# Altium PCB REV_03_Simple_PCB.PcbDoc
Units mm, origin at the board's own origin, x right, y up, seen from the top; angles counter-clockwise.
Board outline 82.44 x 101.76 mm, 2 copper layers (Top Layer, Bottom Layer); 74 components, 66 nets, 302 pads, 56 vias.
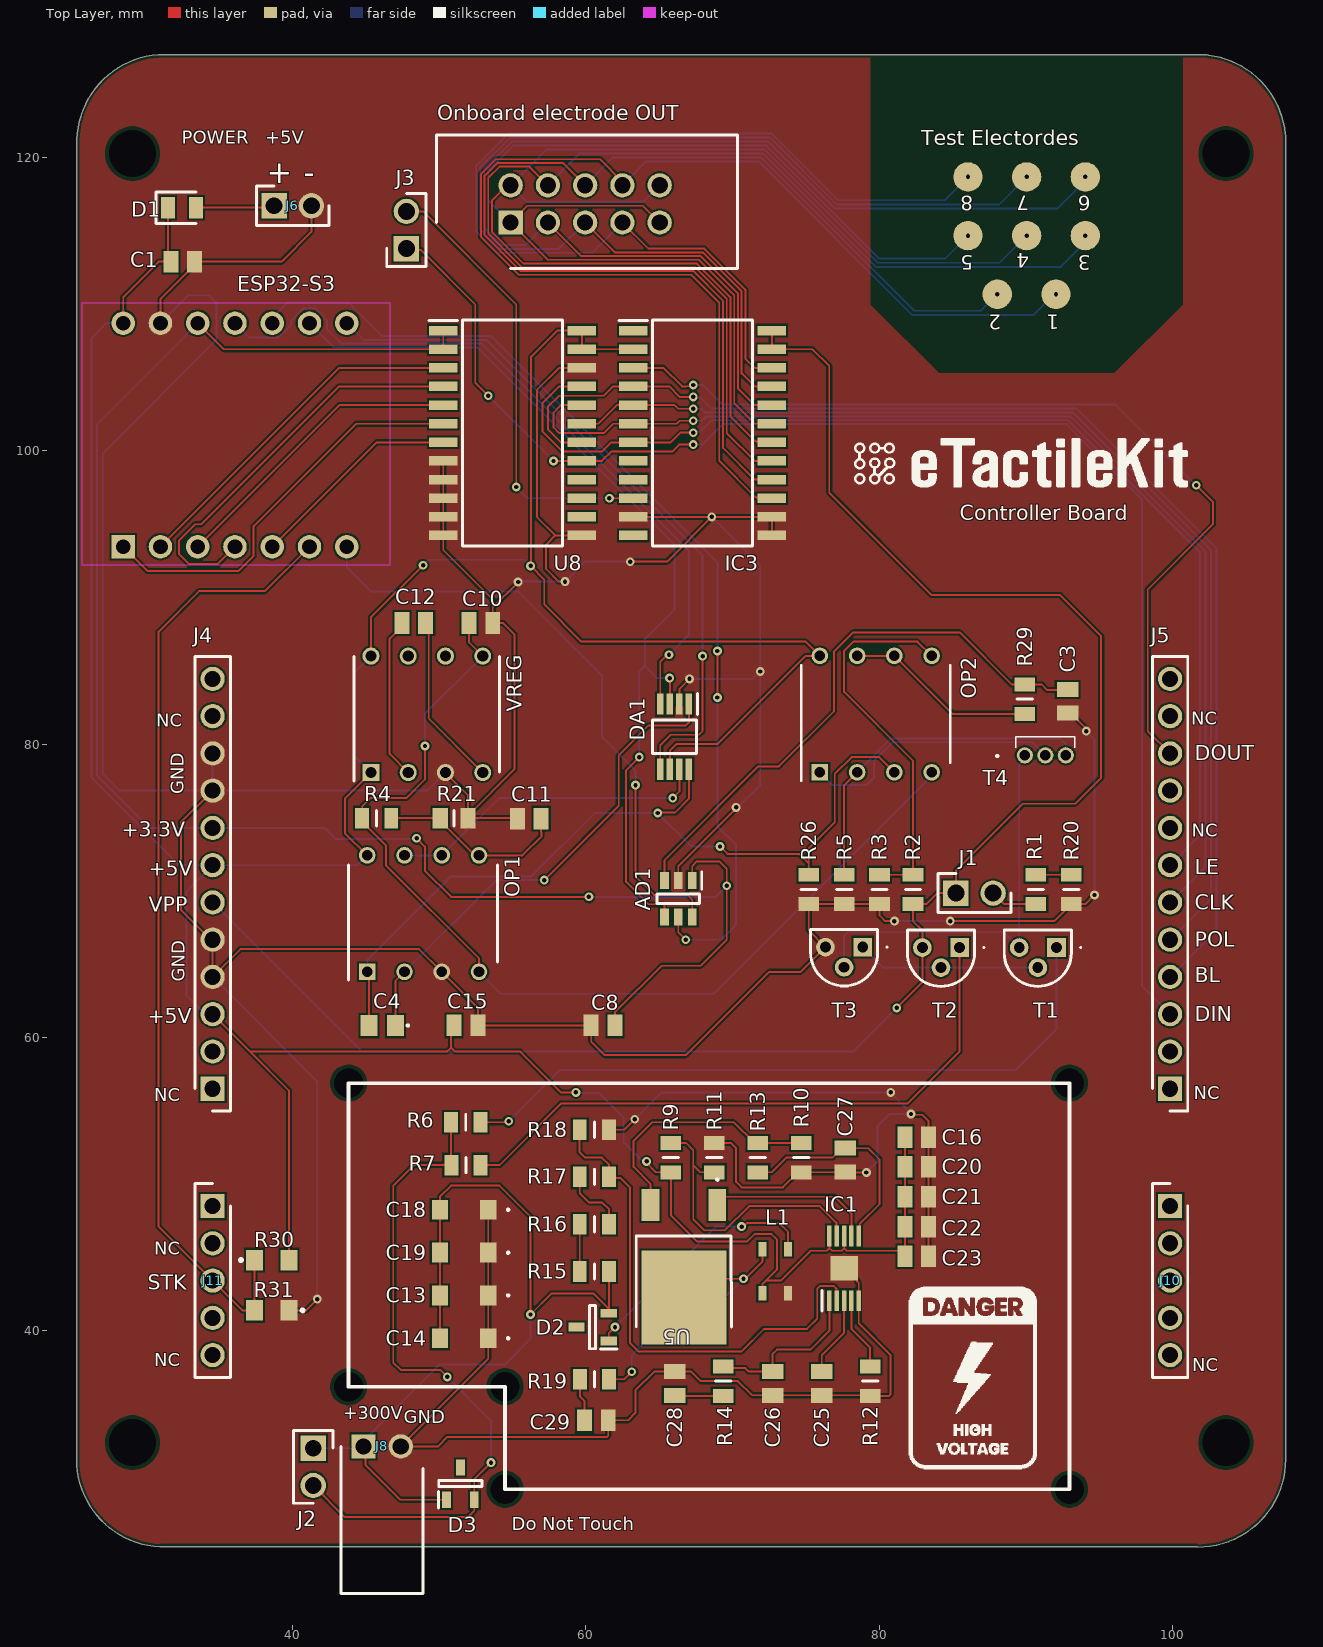
[diagram p0: Top Layer view]
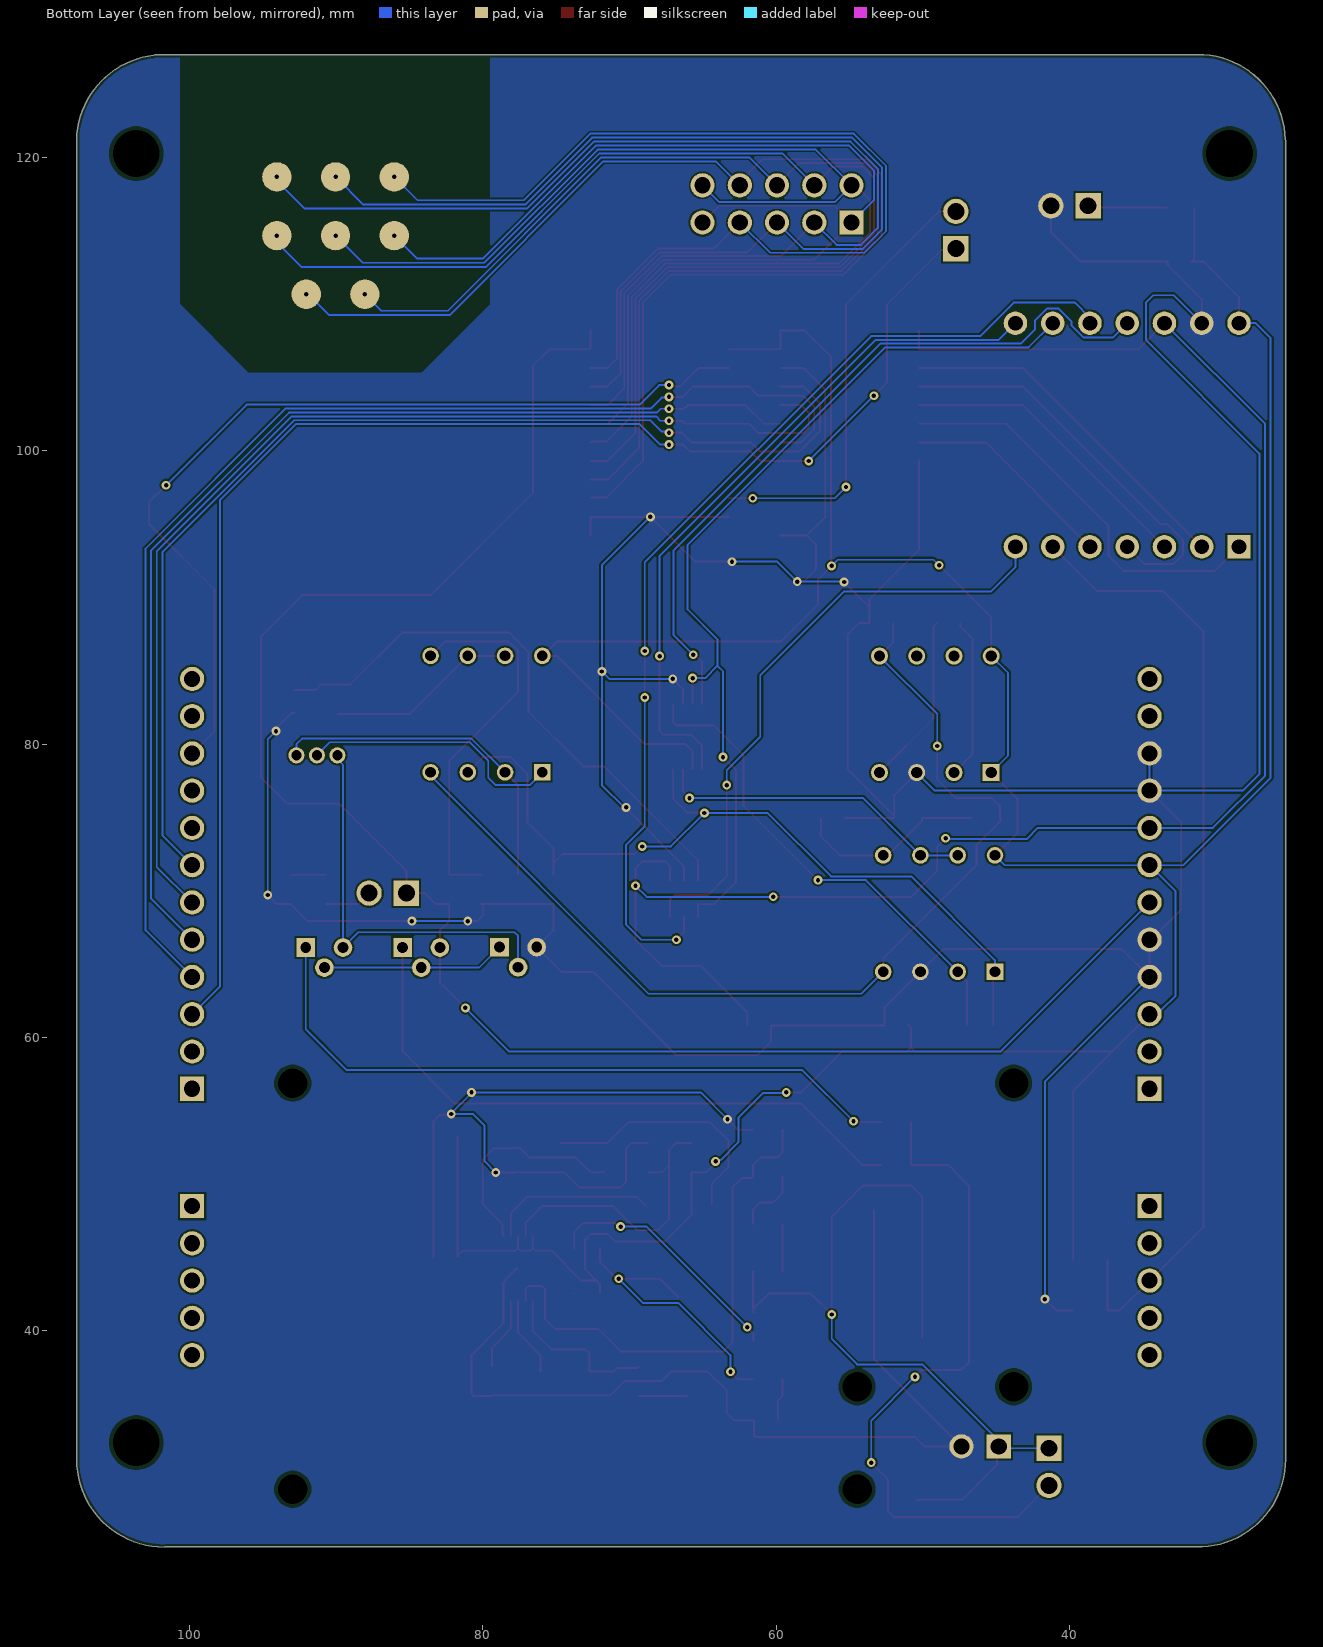
[diagram p1: Bottom Layer view, seen from below]
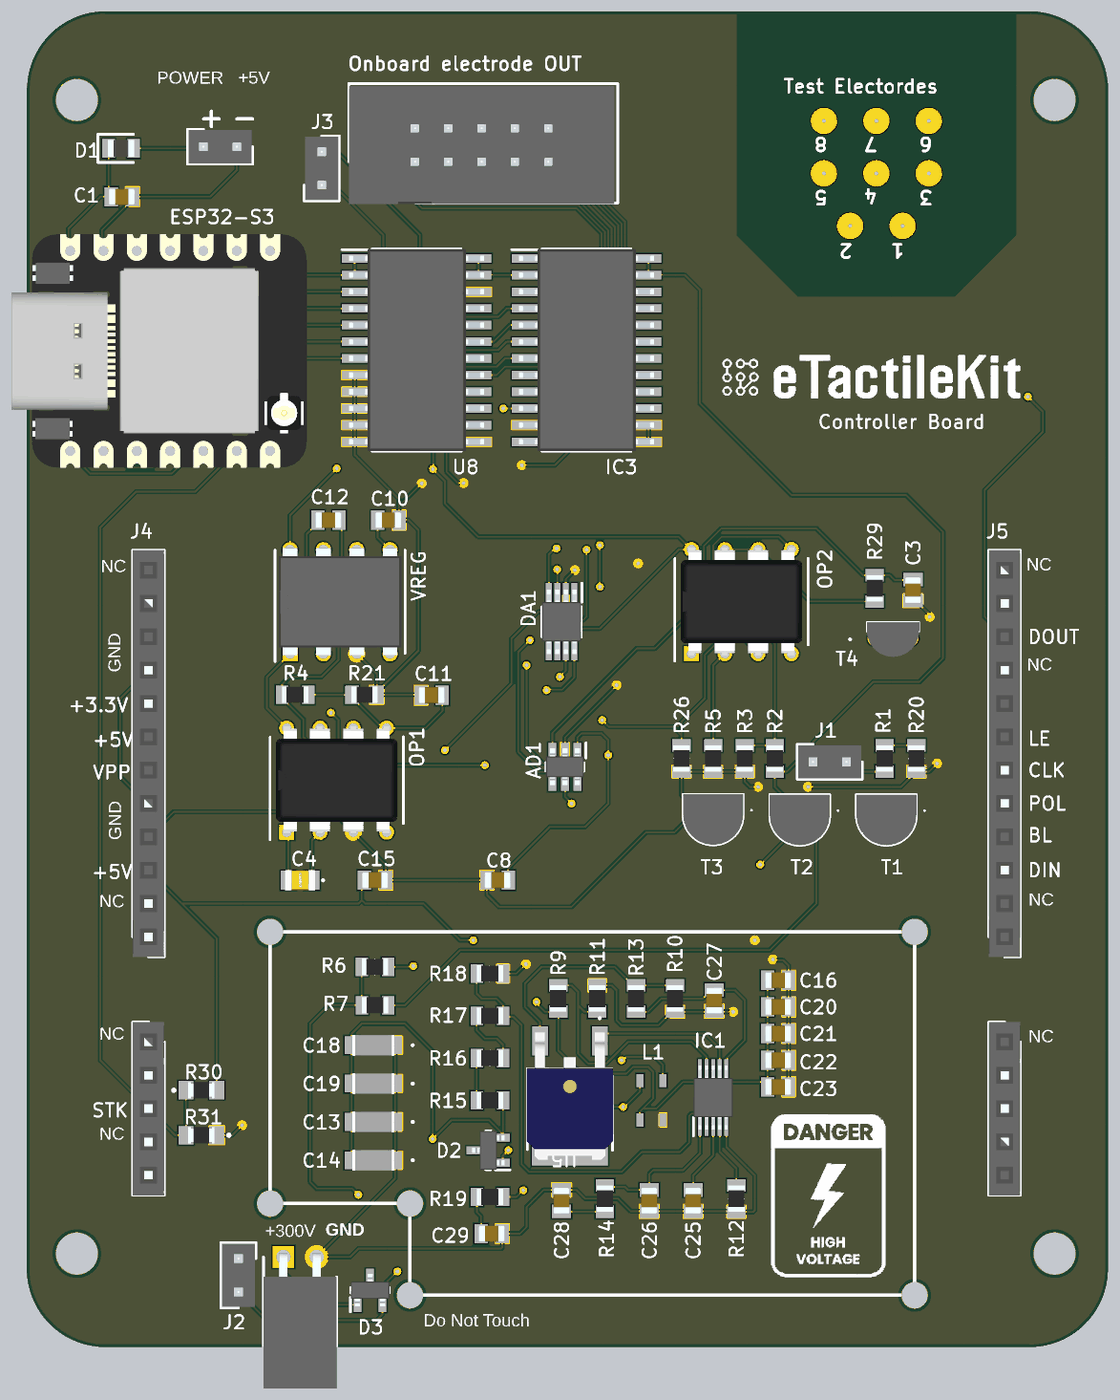
[diagram p2: 3D render of the assembled board from above, using the file's embedded part models]

## Layer stack, top to bottom
Top Solder: solder mask 0.0102, Solder Resist, Dk 3.5
Top Layer: signal copper 0.0356
Dielectric 1: dielectric 0.32, FR-4, Dk 4.8
Bottom Layer: signal copper 0.0356
Bottom Solder: solder mask 0.0102, Solder Resist, Dk 3.5

## Board outline
25.273,31.293 25.273,121.158 25.29,121.222 cw(c31.264,121.048) 31.264,127.025 31.339,127 91.821,127 101.657,127 101.726,127.021 cw(c101.726,121.044) 102.22,127 102.362,127 102.433,126.979 cw(c101.726,121.044) 107.677,121.607 107.696,121.539 107.696,121.333 cw(c101.726,121.044) 107.703,121.044 107.696,121.002 107.696,31.242 107.696,31.241 cw(c101.719,31.242) 101.719,25.265 101.676,25.273 30.988,25.273 30.945,25.28 cw(c31.242,31.25)

## Design rules (kind name [scope] priority, off if disabled: settings)
BoardOutlineClearance [All] p1: gap=0.2 ignorepadtopadclearanceinfootprint=FALSE
Clearance [All] p1: gap=0.127 ignorepadtopadclearanceinfootprint=FALSE except(0.25: Arc-Hole Track-Hole SMDPad-Hole THPad-Hole Via-Hole Fill-Hole Poly-Hole Region-Hole Text-Hole)
ComponentClearance [All] p1: gap=0.127 collisioncheckmode=3 verticalgap=0.127 showdistances=TRUE
DiffPairsRouting [All] p1: maxlimit=0.254 minlimit=0.127 mostfreqgap=0.127 toplayer_minwidth=0.127 toplayer_maxwidth=25.4 toplayer_prefwidth=0.127 bottomlayer_minwidth=0.127 bottomlayer_maxwidth=25.4 bottomlayer_prefwidth=0.127 maxuncoupledlength=12.7
Height [All] p1: minheight=0 maxheight=1816.048 prefheight=12.7
HoleSize [All] p1: absolutevalues=TRUE maxlimit=6.3 minlimit=0.3 maxpercent=80.000 minpercent=20.000
HoleToHoleClearance [All] p1: gap=0.25 allowstackedmicrovias=FALSE
MinimumAnnularRing [All] p1: minimumring=0.076
MinimumSolderMaskSliver [All] p1: minsoldermaskwidth=0
PlaneClearance [All] p1: clearance=0.127
PlaneConnect PlaneConnectPowerPads [InPadClass('PowerPads')] p1: planeconnectstyle=Direct reliefexpansion=0.508 reliefentries=4 reliefconductorwidth=0.254 reliefairgap=0.254
PlaneConnect [All] p2: planeconnectstyle=Direct reliefexpansion=0.3 reliefentries=4 reliefconductorwidth=0.127 reliefairgap=0.127
PolygonConnect PolygonConnectPowerPads [All vs (InPadClass('PowerPads'))] p1: connectstyle=Direct reliefconductorwidth=0.254 reliefentries=4 polygonreliefangle="90 Angle" airgapwidth=0.254
PolygonConnect [All] p2: connectstyle=Direct reliefconductorwidth=0.127 reliefentries=4 polygonreliefangle="90 Angle" airgapwidth=0.127
RoutingVias [All] p1: holewidth=0.3 width=0.6 viastyle="Through Hole" minholewidth=0.3 minwidth=0.6 maxholewidth=0.3 maxwidth=0.6
SilkToSilkClearance [All] p1: silktosilkclearance=0
SilkToSolderMaskClearance [IsPad] p1: minsilkscreentomaskgap=0.127 clearancetoexposedcopper=TRUE
SolderMaskExpansion [All] p1: expansion=0.075 istentingtop=FALSE
Width [All] p1: maxlimit=25.4 minlimit=0.127 preferedwidth=0.127 minimp=50.000000 maximp=50.000000 favimp=50.000000
20 further rules are at their usual default settings.

## Classes and differential pairs
net class OUT[8..1]: OUT1 OUT2 OUT3 OUT4 OUT5 OUT6 OUT7 OUT8
component class Sheet5: IC3 J3 J9 J10 J11 "Onboard electrode OUT" R30 R31
component class Sheet4: C1 C10 C12 D1 ESP32-S3 J4 J5 J6 U1 U8 VREG
component class Sheet3: C13 C14 C16 C18 C19 C20 C21 C22 C23 C25 C26 C27 C28 C29 D2 D3 IC1 J J2 J8 L1 R9 R10 R11 R12 R13 R14 R15 R16 R17 R18 R19 U5
component class Sheet2: C3 J1 OP2 R1 R2 R3 R5 R6 R7 R20 R26 R29 T1 T2 T3 T4
component class Sheet1: AD1 C4 C8 C11 C15 DA1 OP1 R4 R21

## Components (designator, comment, footprint, x,y, rotation, side; value= is the part's Value field where it differs from the comment)
AD1 "AD7276BUJZ-REEL7" SOT95P280X100-6N 66.294,69.469 r270 top
C1 "KGM21NR71E104KT" CAPC2012X100N 32.512,112.903 r180 top
C3 "08053A102FAT2A" CAPC2012X100N 92.837,82.931 r90 top
C4 "C0805C209D3HACTU" C0805 46.101,60.823 r180 top
C8 "KGM21NR71E104KT" CAPC2012X100N 61.166,60.833 r0 top
C10 "GRM21BR61A476ME15K" CAPC2012X100N 52.832,88.265 r180 top
C11 "KGM21NR71E104KT" CAPC2012X100N 56.134,74.93 r0 top
C12 "GRM21BR61A476ME15K" CAPC2012X100N 48.26,88.265 r180 top
C13 "GR331CD7LP683KW01K" C3216_Commercial 51.689,42.418 r180 top
C14 "GR331CD7LP683KW01K" C3216_Commercial 51.689,39.497 r180 top
C15 "KGM21NR71E104KT" CAPC2012X100N 51.816,60.833 r180 top
C16 "GRM21BR61A476ME15K" CAPC2012X100N 82.55,53.213 r180 top
C18 "GR331CD7LP683KW01K" C3216_Commercial 51.689,48.26 r180 top
C19 "GR331CD7LP683KW01K" C3216_Commercial 51.689,45.339 r180 top
C20 "GRM21BR61A476ME15K" CAPC2012X100N 82.55,51.181 r180 top
C21 "GRM21BR61A476ME15K" CAPC2012X100N 82.55,49.149 r180 top
C22 "GRM21BR61A476ME15K" CAPC2012X100N 82.55,47.117 r180 top
C23 "GRM21BR61A476ME15K" CAPC2012X100N 82.55,45.085 r180 top
C25 "KGM21NR71E104KT" CAPC2012X100N 76.068,36.421 r90 top
C26 "08053C101JAT2A" CAPC2012X100N 72.725,36.421 r90 top
C27 "C0805C103J3GACAUTO" CAPC2012X100N 77.687,51.661 r90 top
C28 "VJ0805Y223KXXAC" CAPC2012X100N 66.04,36.421 r270 top
C29 "08053A221KAT2A" CAPC2012X100N 60.706,33.909 r180 top
D1 "SD0805S020S0R5" DIOC2013X100N 32.451,116.586 r0 top
D2 "GSD2004S-HE3-08" SOT95P248X115-3N 60.452,40.259 r180 top
D3 "GSD2004S-HE3-08" SOT95P248X115-3N 51.435,29.591 r90 top
DA1 "AD5452YRMZ-REEL7" SOP65P490X110-8N 66.04,80.518 r270 top
ESP32-S3 "MOUDLE-SEEEDUINO-XIAO-ESP32S3-SMD" MOUDLE14P-2-54-21X17-8MM 36.068,101.092 r180 top
IC1 "LT3757IMSE#PBF" SOP50P490X110-11N 77.597,44.27 r90 top
IC3 "HV513WG-G" SOIC127P1030X265-24N 67.945,101.219 r0 top
J1 "67996-100HLF" HDRV2W67P254_2X1_254X483X858P 85.217,69.85 r270 top
J2 "67996-100HLF" HDRV2W67P254_2X1_254X483X858P 41.402,32.004 r180 top
J3 "67996-100HLF" HDRV2W67P254_2X1_254X483X858P 47.752,113.792 r0 top
J4 "SSQ-112-01-S-S" RHDR12W64P254_1X12_3099X241X851P 34.544,56.515 r270 top
J5 "SSQ-112-01-S-S" RHDR12W64P254_1X12_3099X241X851P 99.822,56.515 r270 top
J6 "67996-100HLF" HDRV2W67P254_2X1_254X483X858P 38.735,116.713 r270 top
J8 "SSQ-102-02-S-S-RA" RHDRRA2W64P254_1X2_559X851X241P 44.831,32.131 r180 top
J10 "SSQ-105-01-S-S" RHDR5W64P254_1X5_1321X241X851P 99.822,48.514 r90 top
J11 "SSQ-105-01-S-S" RHDR5W64P254_1X5_1321X241X851P 34.544,48.514 r90 top
L1 "ATB322515" ATB322515 72.898,44.069 r270 top
"Onboard electrode OUT" "PRT-08506" SHDR10W64P254_2X5_2025X900X935P 54.864,115.57 r0 top
OP1 "TL072ACP" DIP794W53P254L959H508Q8N 48.895,68.453 r90 top
OP2 "TL072ACP" DIP794W53P254L959H508Q8N 79.756,82.057 r90 top
R1 "ERJ-P06F3302V" RESC2012X60N 90.678,70.104 r270 top
R2 "HV732ARTTD105J" RESC2012X60N 82.296,70.104 r270 top
R3 "RK73H2ATTD9101F" RESC2012X60N 80.01,70.104 r90 top
R4 "RK73B2ATTD123J" RESC2012X60N 45.72,74.965 r180 top
R5 "ERJ-P06F2201V" RESC2012X60N 77.597,70.104 r90 top
R6 "ERJ-P06F2702V" RESC2012X60N 51.8,54.229 r180 top
R7 "ERJ-P06J102V" RESC2012X60N 51.816,51.308 r180 top
R9 "RCC0805100KFKEA" RESC2012X60N 65.786,51.816 r270 top
R10 "WSL0805R0200FEA18" RESC2012X60N 74.685,51.816 r270 top
R11 "RCC080547K0FKEA" RESC2012X60N 68.752,51.816 r270 top
R12 "RK73B2ATTD134J" RESC2012X60N 79.375,36.576 r90 top
R13 "ERJ-T06J220V" RESC2012X60N 71.719,51.816 r270 top
R14 "RK73B2ATTDD682J" RESC2012X60N 69.347,36.576 r90 top
R15 "ERJ-P06F1004V" RESC2012X60N 60.574,44.051 r180 top
R16 "ERJ-P06F1004V" RESC2012X60N 60.574,47.275 r0 top
R17 "ERJ-P06F1004V" RESC2012X60N 60.574,50.498 r0 top
R18 "RK73H2ATTD1782F" RESC2012X60N 60.574,53.721 r0 top
R19 "ERJ-T06J220V" RESC2012X60N 60.579,36.703 r180 top
R20 "ERJ-P06F3302V" RESC2012X60N 93.091,70.104 r90 top
R21 "ERJ-PB6B2402V" RESC2012X70N 51.005,74.965 r0 top
R26 "RK73H2ATTD1002F" RESC2012X60N 75.184,70.104 r90 top
R29 "CRS0805-FX-1000ELF" RESC2012X60N 89.916,83.074 r270 top
R30 "CRCW080540K0FKEA" ERJP06D1000V 38.576,44.831 r0 top
R31 "RCA080560K4FKEA" ERJP06D1000V 38.576,41.402 r180 top
T1 "ZTX958" KSP92BU 92.075,66.14 r0 top
T2 "ZTX958" KSP92BU 85.471,66.14 r0 top
T3 "ZTX958" KSP92BU 78.867,66.167 r0 top
T4 "ZVN0545A" BS107P 90.043,79.248 r0 top
U5 "IPD25N06S4L30ATMA2" IPD25N06S4L30ATMA2 66.675,43.371 r180 top
U8 "SN74LVC8T245DWRG4" SOIC127P1030X265-24N 54.991,101.219 r0 top
VREG "MAX1044CPA+" DIP794W56P254L938H457Q8N 49.149,82.042 r90 top

## Footprints (in the part's own frame and the unit in brackets; to place one, negate y for a bottom-side part, rotate by r counter-clockwise, add the part's x,y. Pads: shape width x height; smd on the part's side, far side on the other; paste and mask are expansions set on the pad)
ATB322515 [mm]
  rect 1x0.55 smd: P$1(-1.5,-0.875) P$2(-1.5,0.875) P$3(1.5,0.875) P$4(1.5,-0.875)
BS107P [mm]
  round 1.1 hole 0.695: 1(-0.127,0) 2(1.27,0) 3(2.667,0)
  silkscreen extent -2.05,-0.1 3.27,1.27, body extent -0.73,-1.4 3.27,1.24, height 4.11
C0805 [mm]
  rect 1.15x1.45 smd: 1(-0.9,0) 2(0.9,0)
  silkscreen extent -1.8,-0.05 -1.7,0.05, body extent -1.15,-0.78 1.15,0.77, height 0.98
C3216_Commercial [mm]
  rect 1.1x1.35 smd: 1(-1.65,0) 2(1.65,0)
  silkscreen extent -3.05,-0.05 -2.95,0.05, body extent -1.6,-0.8 1.6,0.8, height 1.6
CAPC2012X100N [mm]
  rect 1.02x1.47 smd: 1(-0.81,0) 2(0.81,0)
  body extent -1,-0.63 1,0.63, height 1
DIOC2013X100N [mm]
  rect 0.95x1.45 smd: 1(-0.95,0) 2(0.95,0)
  silkscreen extent -1.78,-1.07 0.95,1.07, body extent -1,-0.65 1,0.65, height 1
DIP794W53P254L959H508Q8N [mm]
  rect 1.13x1.13 hole 0.73: 1(-3.97,3.81)
  round 1.13 hole 0.73: 2(-3.97,1.27) 3(-3.97,-1.27) 4(-3.97,-3.81) 5(3.97,-3.81) 6(3.97,-1.27) 7(3.97,1.27) 8(3.97,3.81)
  silkscreen extent -4.53,-5.08 3.3,5.08, body extent -4.1,-4.64 4.1,4.64, height 4.21
DIP794W56P254L938H457Q8N [mm]
  rect 1.16x1.16 hole 0.76: 1(-3.97,3.81)
  round 1.16 hole 0.76: 2(-3.97,1.27) 3(-3.97,-1.27) 4(-3.97,-3.81) 5(3.97,-3.81) 6(3.97,-1.27) 7(3.97,1.27) 8(3.97,3.81)
  silkscreen extent -4.55,-4.95 3.94,4.95, body extent -4.11,-4.69 4.11,4.69, height 4.57
ERJP06D1000V [mm]
  rect 1.15x1.4 smd: 1(-1.175,0) 2(1.175,0)
  silkscreen extent -2.2,-0.1 -2,0.1, body extent -1,-0.63 1,0.63, height 0.6
HDRV2W67P254_2X1_254X483X858P [mm]
  rect 1.725x1.725 / inner round 1.725 / far side rect 1.725x1.725 hole 1.15: 1(0,0)
  round 1.725 hole 1.15: 2(0,2.54)
  silkscreen extent -1.34,-1.21 1.34,3.75, body extent -1.27,-1.14 1.27,3.68, height 8.58
IPD25N06S4L30ATMA2 [mm]
  rect 1.2x2.2 smd: 1(-2.28,-5.22) 3(2.28,-5.22)
  rect 5.8x6.4 smd: 2(0,1.08)
  silkscreen extent -3.25,-7 3.25,3.11, body extent -3.3,-5.87 3.3,3.83, height 2.4
KSP92BU [mm]
  rect 1.269x1.269 hole 0.74: 1(0,0)
  round 1.269 hole 0.74: 2(-1.27,-1.37) 3(-2.54,0)
  silkscreen extent -3.56,-2.65 1.7,1.21, body extent -3.56,-2.65 1.02,1.21, height 4.88
MOUDLE14P-2-54-21X17-8MM [mm]
  rect 1.6x1.6 / inner round 1.478 / far side rect 1.6x1.6 hole 1: 1(7.62,7.62)
  round 1.6 hole 1: 2(5.08,7.62) 3(2.54,7.62) 4(0,7.62) 5(-2.54,7.62) 6(-5.08,7.62) 7(-7.62,7.62) 8(-7.62,-7.62) 9(-5.08,-7.62) 10(-2.54,-7.62) 11(0,-7.62) 12(2.54,-7.62) 13(5.08,-7.62) 14(7.62,-7.62)
  Top Layer keep-out region: -10.541,-9.017 -10.541,8.89 10.414,8.89 10.414,-9.017
  body extent -10.54,-8.95 11.94,8.83, height 4.21
RESC2012X60N [mm]
  rect 0.95x1.4 smd: 1(-1,0) 2(1,0)
  silkscreen extent 0,-0.53 0,0.53, body extent -1,-0.63 1,0.63, height 0.6
RESC2012X70N [mm]
  rect 1.05x1.4 smd: 1(-0.95,0) 2(0.95,0)
  silkscreen extent 0,-0.53 0,0.53, body extent -1,-0.63 1,0.63, height 0.7
RHDR5W64P254_1X5_1321X241X851P [mm]
  rect 1.65x1.65 / inner round 1.65 / far side rect 1.65x1.65 hole 1.1: 1(0,0)
  round 1.65 hole 1.1: 2(-2.54,0) 3(-5.08,0) 4(-7.62,0) 5(-10.16,0)
  silkscreen extent -11.69,-1.2 1.53,1.2, body extent -11.69,-1.2 1.53,1.2, height 8.51
RHDR12W64P254_1X12_3099X241X851P [mm]
  rect 1.65x1.65 / inner round 1.65 / far side rect 1.65x1.65 hole 1.1: 1(0,0)
  round 1.65 hole 1.1: 2(-2.54,0) 3(-5.08,0) 4(-7.62,0) 5(-10.16,0) 6(-12.7,0) 7(-15.24,0) 8(-17.78,0) 9(-20.32,0) 10(-22.86,0) 11(-25.4,0) 12(-27.94,0)
  silkscreen extent -29.47,-1.2 1.53,1.2, body extent -29.47,-1.2 1.53,1.2, height 8.51
RHDRRA2W64P254_1X2_559X851X241P [mm]
  rect 1.65x1.65 hole 1.1: 1(0,0)
  round 1.65 hole 1.1: 2(-2.54,0)
  silkscreen extent -4.07,0 1.53,10.03, body extent -4.07,-0.32 1.53,10.03, height 2.41
SHDR10W64P254_2X5_2025X900X935P [mm]
  rect 1.65x1.65 hole 1.1: 1(0,0)
  round 1.65 hole 1.1: 2(0,2.54) 3(2.54,0) 4(2.54,2.54) 5(5.08,0) 6(5.08,2.54) 7(7.62,0) 8(7.62,2.54) 9(10.16,0) 10(10.16,2.54)
  silkscreen extent -5.04,-3.15 15.46,5.95, body extent -5.04,-3.23 15.2,5.77, height 9.35
SOIC127P1030X265-24N [mm]
  rect 1.95x0.65 smd: 1(-4.725,6.985) 2(-4.725,5.715) 3(-4.725,4.445) 4(-4.725,3.175) 5(-4.725,1.905) 6(-4.725,0.635) 7(-4.725,-0.635) 8(-4.725,-1.905) 9(-4.725,-3.175) 10(-4.725,-4.445) 11(-4.725,-5.715) 12(-4.725,-6.985) 13(4.725,-6.985) 14(4.725,-5.715) 15(4.725,-4.445) 16(4.725,-3.175) 17(4.725,-1.905) 18(4.725,-0.635) 19(4.725,0.635) 20(4.725,1.905) 21(4.725,3.175) 22(4.725,4.445) 23(4.725,5.715) 24(4.725,6.985)
  silkscreen extent -5.7,-7.7 3.4,7.7, body extent -5.15,-7.7 5.15,7.7, height 2.65
SOP50P490X110-11N [mm]
  rect 1.425x0.3 smd: 1(-2.212,1) 2(-2.212,0.5) 3(-2.212,0) 4(-2.212,-0.5) 5(-2.212,-1) 6(2.212,-1) 7(2.212,-0.5) 8(2.212,0) 9(2.212,0.5) 10(2.212,1)
  rect 1.68x1.88 smd: 11(0,0)
  silkscreen extent -2.93,1.5 -1.5,1.5, body extent -2.45,-1.5 2.45,1.5, height 1.1
SOP65P490X110-8N [mm]
  rect 1.45x0.45 smd: 1(-2.225,0.975) 2(-2.225,0.325) 3(-2.225,-0.325) 4(-2.225,-0.975) 5(2.225,-0.975) 6(2.225,-0.325) 7(2.225,0.325) 8(2.225,0.975)
  silkscreen extent -2.95,-1.5 1.15,1.55, body extent -2.45,-1.5 2.45,1.5, height 1.1
SOT95P248X115-3N [mm]
  rect 1.1x0.6 smd: 1(-1.1,0.95) 2(-1.1,-0.95) 3(1.1,0)
  silkscreen extent -1.65,-1.48 0.2,1.5, body extent -1.24,-1.48 1.24,1.48, height 1.15
SOT95P280X100-6N [mm]
  rect 1.15x0.6 smd: 1(-1.25,0.95) 2(-1.25,0) 3(-1.25,-0.95) 4(1.25,-0.95) 5(1.25,0) 6(1.25,0.95)
  silkscreen extent -1.83,-1.45 0.33,1.6, body extent -1.4,-1.45 1.4,1.45, height 1

## Part data
AD1: "Integrated Circuit", Manufacturer_Name="Analog Devices", Arrow Part Number=AD7276BUJZ-REEL7, Arrow Price/Stock=https://www.arrow.com/en/products/ad7276bujz-reel7/analog-devices, Datasheet Link=https://www.arrow.com/en/products/ad7276bujz-reel7/analog-devices, Height=1mm, Manufacturer_Part_Number=AD7276BUJZ-REEL7
C1 C8 C11 C15 C25: "Capacitor", Manufacturer_Name=KYOCERA, Mouser Part Number=581-KGM21NR71E104KT, Datasheet Link=https://spicat.kyocera-avx.com/product/mlcc/chartview/KGM21NR71E104KT/DataSheet/X7R, Height=1mm, Manufacturer_Part_Number=KGM21NR71E104KT, Mouser Price/Stock=https://www.mouser.co.uk/ProductDetail/KYOCERA-AVX/KGM21NR71E104KT?qs=OcgtsXO%252B3gt5l3KgnBGsBw%3D%3D
C3 C10 C12 C16 C20 C21 C22 C23 C26 C27 C28 C29: library part KGM21NR71E104KT, "Capacitor", Manufacturer_Name=KYOCERA, Mouser Part Number=581-KGM21NR71E104KT, Datasheet Link=https://spicat.kyocera-avx.com/product/mlcc/chartview/KGM21NR71E104KT/DataSheet/X7R, Height=1mm, Manufacturer_Part_Number=KGM21NR71E104KT, Mouser Price/Stock=https://www.mouser.co.uk/ProductDetail/KYOCERA-AVX/KGM21NR71E104KT?qs=OcgtsXO%252B3gt5l3KgnBGsBw%3D%3D
C4: "Capacitor", Manufacturer_Name=KEMET, Datasheet Link=https://content.kemet.com/datasheets/KEM_C1007_X8R_ULTRA_150C_SMD.pdf, Height=1.1mm, Manufacturer_Part_Number=C0805C209D3HACTU
C13 C14 C18 C19: library part C3216X7T2W683K130AA, "Capacitor", Manufacturer_Name=TDK, Datasheet Link=https://product.tdk.com/system/files/dam/doc/product/capacitor/ceramic/mlcc/catalog/mlcc_commercial_midvoltage_en.pdf, Height=0.75mm, Manufacturer_Part_Number=C3216X7T2W683K130AA
D1: "Diode", Manufacturer_Name=AVX, Mouser Part Number=581-SD0805S020S0R5, Arrow Part Number=SD0805S020S0R5, Arrow Price/Stock=https://www.arrow.com/en/products/sd0805s020s0r5/avx, Datasheet Link=https://datasheets.kyocera-avx.com/schottky.pdf, Height=1mm, Manufacturer_Part_Number=SD0805S020S0R5, Mouser Price/Stock=https://www.mouser.co.uk/ProductDetail/AVX/SD0805S020S0R5?qs=jCA%252BPfw4LHZ%252BeTNuLGlRmA%3D%3D
D2 D3: "Diode", Manufacturer_Name=Vishay, Mouser Part Number=78-GSD2004S-HE3-08, Arrow Part Number=GSD2004S-HE3-08, Arrow Price/Stock=https://www.arrow.com/en/products/gsd2004s-he3-08/vishay?region=nac, Datasheet Link=https://eagle.componentsearchengine.com/Datasheets/1/GSD2004S-HE3-08.pdf, Height=1.15mm, Manufacturer_Part_Number=GSD2004S-HE3-08, Mouser Price/Stock=https://www.mouser.co.uk/ProductDetail/Vishay-Semiconductors/GSD2004S-HE3-08?qs=uS%252BVSIFnvp5GJDCoADy1cg%3D%3D
DA1: "Integrated Circuit", Manufacturer_Name="Analog Devices", Mouser Part Number=584-AD5452YRMZ-R7, Arrow Part Number=AD5452YRMZ-REEL7, Arrow Price/Stock=https://www.arrow.com/en/products/ad5452yrmz-reel7/analog-devices, Datasheet Link=https://componentsearchengine.com/Datasheets/1/AD5452YRMZ-REEL7.pdf, Height=1.1mm, Manufacturer_Part_Number=AD5452YRMZ-REEL7, Mouser Price/Stock=https://www.mouser.com/Search/Refine.aspx?Keyword=584-AD5452YRMZ-R7
ESP32-S3: Package=MOUDLE14P-SMD-2.54-21X17.8MM, DeviceName=-SMD, DeviceSetName=MOUDLE-SEEEDUINO-XIAO-ESP32S3, GateName_1=G$1, LibraryName="Seeed-Studio-XIAO-ESP32S3-footprint-eagle (1)", SymbolName_1=MOUDLE-SEEEDUINO-XIAO-ESP32S3
IC1: "Integrated Circuit", Manufacturer_Name="Analog Devices", Mouser Part Number=584-LT3757IMSE#PBF, Arrow Part Number=LT3757IMSE#PBF, Arrow Price/Stock=https://www.arrow.com/en/products/lt3757imsepbf/analog-devices?region=europe, Datasheet Link=https://datasheet.datasheetarchive.com/originals/distributors/Datasheets-SFU4/DSASF4000-3305.pdf, Height=1.1mm, Manufacturer_Part_Number=LT3757IMSE#PBF, Mouser Price/Stock=https://www.mouser.co.uk/ProductDetail/Analog-Devices/LT3757IMSEPBF?qs=hVkxg5c3xu%252BnKf7DPP6rNg%3D%3D
IC3: "Integrated Circuit", Manufacturer_Name=Microchip, Mouser Part Number=689-HV513WG-G, Arrow Part Number=HV513WG-G, Arrow Price/Stock=https://www.arrow.com/en/products/hv513wg-g/microchip-technology?region=nac, Datasheet Link=http://ww1.microchip.com/downloads/en/DeviceDoc/20005846A.pdf, Height=2.65mm, Manufacturer_Part_Number=HV513WG-G, Mouser Price/Stock=https://www.mouser.co.uk/ProductDetail/Microchip-Technology/HV513WG-G?qs=wSTxOR59s%2FzutPVpK8md7g%3D%3D
J1 J2 J3 J6: "BergStik<sup>&reg;</sup>, Board to Board connector, Unshrouded vertical header, Through Hole, Double Row, 0 Positions, 2.54 mm (0.100in) Pitch", Manufacturer_Name="Amphenol Communications Solutions", Datasheet Link=https://cdn.amphenol-cs.com/media/wysiwyg/files/drawing/67996.pdf, Geometry.Height=8.58mm, Manufacturer_Part_Number=67996-100HLF
J4 J5: "12 Position, .100&quot; Tiger Buy&trade; Socket Strip, Square Tail, Single Row", Manufacturer_Name=SAMTEC, Mouser Part Number=200-SSQ11201SS, Datasheet Link=http://suddendocs.samtec.com/prints/ssq-1xx-xx-xxx-x-xx-xxx-xx-x-mkt.pdf, Geometry.Height=8.51mm, Manufacturer_Part_Number=SSQ-112-01-S-S, Mouser Price/Stock=https://www.mouser.co.uk/ProductDetail/Samtec/SSQ-112-01-S-S?qs=rU5fayqh%252BE2QzWr5YZvwlg%3D%3D
J8: "Connector", Manufacturer_Name=SAMTEC, Arrow Part Number=SSQ-102-02-S-S-RA, Arrow Price/Stock=https://www.arrow.com/en/products/ssq-102-02-s-s-ra/samtec, Datasheet Link=http://suddendocs.samtec.com/catalog_english/ssq_th.pdf, Height=2.41mm, Manufacturer_Part_Number=SSQ-102-02-S-S-RA
J10 J11: "5 Position, .100&quot; Tiger Buy&trade; Socket Strip, Square Tail, Single Row", Manufacturer_Name=SAMTEC, Mouser Part Number=200-SSQ10501SS, Datasheet Link=http://suddendocs.samtec.com/prints/ssq-1xx-xx-xxx-x-xx-xxx-xx-x-mkt.pdf, Geometry.Height=8.51mm, Manufacturer_Part_Number=SSQ-105-01-S-S, Mouser Price/Stock=https://www.mouser.co.uk/ProductDetail/Samtec/SSQ-105-01-S-S?qs=rU5fayqh%252BE15SmaD0WxGBw%3D%3D
"Onboard electrode OUT": "Connector", Manufacturer_Name=SparkFun, Mouser Part Number=474-PRT-08506, Datasheet Link=https://www.sparkfun.com/datasheets/Prototyping/Shrouded-10pin.pdf, Height=9.35mm, Manufacturer_Part_Number=PRT-08506, Mouser Price/Stock=https://www.mouser.co.uk/ProductDetail/SparkFun/PRT-08506?qs=WyAARYrbSnY9pAhwbp%252BzlQ%3D%3D
OP1 OP2: "Integrated Circuit", Manufacturer_Name="Texas Instruments", Mouser Part Number=595-TL072ACP, Arrow Part Number=TL072ACP, Arrow Price/Stock=https://www.arrow.com/en/products/tl072acp/texas-instruments?region=nac, Datasheet Link=http://www.ti.com/lit/ds/symlink/tl071a.pdf, Height=5.08mm, Manufacturer_Part_Number=TL072ACP, Mouser Price/Stock=https://www.mouser.co.uk/ProductDetail/Texas-Instruments/TL072ACP?qs=0OT4q4QBUTLFvIZ%252B%2FvrwoQ%3D%3D
R1 R2 R3 R5 R6 R7 R9 R10 R11 R12 R13 R14 R15 R16 R17 R18 R19 R20 R26 R29: library part RK73B2ATTD123J, "Resistor", Manufacturer_Name="KOA Speer", Datasheet Link=https://www.mouser.jp/datasheet/2/219/RK73B-1825463.pdf, Height=0.6mm, Manufacturer_Part_Number=RK73B2ATTD123J
R4: "Resistor", Manufacturer_Name="KOA Speer", Datasheet Link=https://www.mouser.jp/datasheet/2/219/RK73B-1825463.pdf, Height=0.6mm, Manufacturer_Part_Number=RK73B2ATTD123J
R21: "Resistor", Manufacturer_Name=Panasonic, Mouser Part Number=667-ERJ-PB6B2402V, Datasheet Link=https://componentsearchengine.com/Datasheets/1/ERJ-PB6B2402V.pdf, Height=0.7mm, Manufacturer_Part_Number=ERJ-PB6B2402V, Mouser Price/Stock=https://www.mouser.com/Search/Refine.aspx?Keyword=667-ERJ-PB6B2402V
R30 R31: library part ERJ-P06F5103V, "Resistor", Manufacturer_Name=Panasonic, Mouser Part Number=667-ERJ-P06F5103V, Datasheet Link=http://industrial.panasonic.com/cdbs/www-data/pdf/RDA0000/AOA0000C102.pdf, Height=0.7mm, Manufacturer_Part_Number=ERJ-P06F5103V, Mouser Price/Stock=https://www.mouser.co.uk/ProductDetail/Panasonic/ERJ-P06F5103V?qs=iIVTEDlrHA2ZP3yozH4uHg%3D%3D
T1 T2 T3: library part KSP92BU, "Transistor BJT PNP", Manufacturer_Name=onsemi, Mouser Part Number=512-KSP92BU, Arrow Part Number=KSP92BU, Arrow Price/Stock=https://www.arrow.com/en/products/ksp92bu/on-semiconductor?region=nac, Datasheet Link=https://www.onsemi.com/pdf/datasheet/ksp92-d.pdf, Height=4.78mm, Manufacturer_Part_Number=KSP92BU, Mouser Price/Stock=https://www.mouser.co.uk/ProductDetail/onsemi-Fairchild/KSP92BU?qs=ReZUMDdiXnTz1Ne%252BGFaZdA%3D%3D
T4: library part BS107P, "MOSFET (N-Channel)", Manufacturer_Name="Diodes Incorporated", Mouser Part Number=522-BS107P, Arrow Part Number=BS107P, Arrow Price/Stock=https://www.arrow.com/en/products/bs107p/diodes-incorporated, Datasheet Link=https://www.diodes.com/assets/Datasheets/BS107P.pdf, Height=4.01mm, Manufacturer_Part_Number=BS107P, Mouser Price/Stock=https://www.mouser.co.uk/ProductDetail/Diodes-Incorporated/BS107P/?qs=xZ%2FP%252Ba9zWqZfqH3YLLUN6w%3D%3D
U5: "MOSFET (N-Channel)", Manufacturer_Name=Infineon, Arrow Part Number=IPD25N06S4L30ATMA2, Arrow Price/Stock=https://www.arrow.com/en/products/ipd25n06s4l30atma2/infineon-technologies-ag?region=nac, Datasheet Link=https://www.infineon.com/dgdl/Infineon-IPD25N06S4L-30-DS-v01_01-EN.pdf?fileId=db3a30431ff98815012038898f7b0caa, Height=2.5mm, Manufacturer_Part_Number=IPD25N06S4L30ATMA2
U8: "Integrated Circuit", Manufacturer_Name="Texas Instruments", Mouser Part Number=595-74LVC8T245DWRG4, Arrow Part Number=SN74LVC8T245DWRG4, Arrow Price/Stock=https://www.arrow.com/en/products/sn74lvc8t245dwrg4/texas-instruments, Datasheet Link=https://www.ti.com/lit/ds/symlink/sn74lvc8t245.pdf?HQS=dis-mous-null-mousermode-dsf-pf-null-wwe&ts=1634017408133&ref_url=https%253A%252F%252Fcz.mouser.com%252F, Height=2.65mm, Manufacturer_Part_Number=SN74LVC8T245DWRG4, Mouser Price/Stock=https://www.mouser.co.uk/ProductDetail/Texas-Instruments/SN74LVC8T245DWRG4?qs=l4wu3mKjyfn59yca0qzZ1Q%3D%3D
VREG: "Power Supply", Manufacturer_Name="Analog Devices", Mouser Part Number=700-MAX1044CPA, Arrow Part Number=MAX1044CPA+, Arrow Price/Stock=https://www.arrow.com/en/products/max1044cpa/maxim-integrated?region=nac, Datasheet Link=https://datasheets.maximintegrated.com/en/ds/ICL7660-MAX1044.pdf, Height=4.572mm, Manufacturer_Part_Number=MAX1044CPA+, Mouser Price/Stock=https://www.mouser.co.uk/ProductDetail/Analog-Devices-Maxim-Integrated/MAX1044CPA%2b?qs=0Y9aZN%252BMVCXfHpZN39Twfg%3D%3D
L1: DeviceSetName=ATB322515, GateName_1=G$1, LibraryName=kajimoto, Package=ATB322515, SymbolName_1=ATB322515

## Free pads (board coordinates)
  round 2 hole 0.3: 1(92.042,110.68) 2(88.042,110.68) 3(94.042,114.68) 4(90.042,114.68) 5(86.043,114.68) 6(94.042,118.68) 7(90.042,118.68) 8(86.043,118.68)
  round 1.524 hole 2: 279(92.964,56.896) 280(92.964,29.21) 281(43.815,36.195) 282(43.815,56.896) 283(54.483,29.21) 284(54.483,36.195)
  round 1.524 hole 3.2: 285(29.083,32.385) 285(29.083,120.269) 285(103.632,32.385) 285(103.632,120.269)

## Via types
v1: diameter 0.6, hole 0.3, Top Layer to Bottom Layer, 56 vias

## Nets (pads, with @x,y where several pads share a name; then routed paths per layer and width w, separated by ;. In a path a pad name is that pad's centre, name@x,y a point inside that pad or via, vN(x,y) a via of type N, cw(c..) or ccw(c..) an arc to the next point about the centre after c; other vN are vias at no path point)
+3V3: AD1.1 C8.2 ESP32-S3.12 J4.8 U8.1 U8.2 | length 119.2
  Top Layer w0.127: ESP32-S3.12 35.306,106.934 U8.2 U8.1 ; v1(48.454,73.59) 49.022,73.022 49.022,71.374 50.8,69.596 v1(60.198,69.596) ; C8.2 61.976,61.722 65.151,64.897 67.818,64.897 69.596,66.675 v1(69.596,70.358) 69.596,71.501 69.088,72.009 67.564,72.009 67.244,71.689 AD1.1
  Bottom Layer w0.127: ESP32-S3.12 26.67,101.854 26.67,77.851 30.226,74.295 J4.8 42.164,74.295 42.926,73.533 48.397,73.533 v1(48.454,73.59) ; v1(60.198,69.596) 68.834,69.596 v1(69.596,70.358)
+5V: C1.2 C15.2 C16.2 C20.2 C21.2 C22.2 C23.2 D1.1 DA1.6 ESP32-S3.14 IC1.8 IC1.10 IC3.2 J4.3 J4.7 L1.P$4 OP1.8 OP2.8 R9.2 R30.2 U8.23 U8.24 VREG.1 VREG.8 | length 257.5
  Top Layer w0.127: ESP32-S3.14 28.448,110.49 30.861,112.903 C1.2 31.501,113.104 D1.1 ; J4.3 37.084,59.055 ; R30.2 39.751,56.388 37.084,59.055 ; OP1.8 43.561,73.947 43.561,76.294 VREG.1 ; VREG.8 45.339,88.646 v1(48.895,92.202) ; C15.2 50.8,60.627 50.8,59.309 ; v1(56.223,92.158) 57.15,91.231 57.15,89.535 59.69,86.995 74.978,86.995 OP2.8 74.978,86.027 68.961,80.01 66.167,80.01 65.715,79.558 DA1.6 ; v1@56.261,92.158 56.261,106.426 58.039,108.204 U8.24 U8.23 IC3.2 ; v1(59.309,56.261) 58.293,56.261 55.499,59.055 51.054,59.055 50.8,59.309 ; v1(64.135,51.562) 64.135,51.451 64.77,50.816 R9.2 65.786,47.879 67.564,46.101 70.993,46.101 71.501,46.609 72.644,46.609 73.025,46.228 73.025,44.196 72.263,43.434 ; L1.P$4 72.023,43.194 72.263,43.434 ; 76.598,45.65 76.414,45.466 75.311,45.466 73.279,43.434 72.263,43.434 ; IC1.10 76.595,46.48 76.595,45.653 76.782,45.466 77.427,45.466 77.607,45.646 ; IC1.8 77.607,46.472 77.607,45.646 ; C16.2 C20.2 C21.2 C22.2 C23.2 81.359,45.466 77.787,45.466 77.607,45.646 ; 37.084,59.055 50.546,59.055 50.8,59.309
  Bottom Layer w0.127: ESP32-S3.14 27.305,108.712 26.289,107.696 26.289,77.724 32.258,71.755 J4.7 ; J4.3 34.253,61.886 33.745,61.886 32.766,62.865 32.766,69.977 J4.7 ; OP1.8 44.417,71.755 J4.7 ; VREG.1 44.196,79.215 44.196,84.869 VREG.8 ; v1(48.895,92.202) 49.276,92.583 55.798,92.583 v1(56.223,92.158) ; v1(59.309,56.261) 59.338,56.232 60.869,56.232 62.575,54.525 62.575,52.868 63.79,51.653 64.044,51.653 v1(64.135,51.562)
+300V: D3.2 J2.2 R6.2 R7.2 | length 46.5
  Top Layer w0.127: J2.2 43.561,27.305 51.943,27.305 52.385,27.747 D3.2 52.385,29.888 v1(53.521,31.025) ; v1(50.539,36.869) 50.069,37.338 47.371,37.338 46.863,37.846 46.863,49.911 48.276,51.324 50.8,51.324 R6.2
  Bottom Layer w0.127: v1(50.539,36.869) 53.521,33.886 v1(53.521,31.025)
-5V: C10.2 OP1.4 OP2.4 R4.2 VREG.5 | length 70.2
  Top Layer w0.127: v1(49.022,79.883) 49.022,77.597 47.752,76.327 45.286,76.327 44.741,75.781 44.741,74.986 R4.2 44.72,74.74 46.355,73.105 46.355,71.755 52.705,65.405 OP1.4 ; C10.2 52.022,86.949 VREG.5
  Bottom Layer w0.127: v1(49.022,79.883) 49.022,82.075 VREG.5 ; OP1.4 54.196,62.992 68.707,62.992 83.566,77.851 OP2.4
AD_CS: AD1.6 ESP32-S3.7 | length 42.2
  Top Layer w0.127: v1(63.373,77.216) 63.373,70.993 64.643,69.723 66.929,69.723 67.244,69.408 AD1.6
  Bottom Layer w0.127: ESP32-S3.7 43.688,92.075 45.339,90.424 55.372,90.424 61.087,84.709 61.087,80.518 63.373,78.232 v1(63.373,77.216)
AD_MISO: AD1.5 ESP32-S3.10 | length 69.6
  Top Layer w0.127: AD1.5 66.294,67.183 v1(66.802,66.675) ; v1(68.961,83.185) v1(68.961,86.36)
  Bottom Layer w0.127: ESP32-S3.10@38.818,108.922 ESP32-S3.10 38.608,109.093 39.624,110.109 43.815,110.109 46.101,107.823 53.534,107.823 68.961,92.396 v1(68.961,86.36) ; v1(66.802,66.675) 69.215,66.675 70.231,67.691 70.231,73.152 68.961,74.422 v1(68.961,83.185)
ADIN: AD1.3 C3.2 R29.1 | length 39.3
  Top Layer w0.127: AD1.3 65.344,72.075 71.755,78.486 73.152,78.486 76.898,82.232 76.898,86.296 78.232,87.63 85.471,87.63 89.027,84.074 R29.1 91.059,84.074 91.44,83.693 92.789,83.693 C3.2
BL: IC3.4 J5.4 U8.18 | length 85.5
  Top Layer w0.127: U8.18 58.293,100.584 57.404,101.473 57.404,102.997 58.166,103.759 61.214,103.759 61.849,104.394 IC3.4 65.674,104.394 66.395,103.672 67.299,103.672 v1(67.31,103.683)
  Bottom Layer w0.127: v1(67.31,103.683) 67.361,103.632 67.818,103.632 68.568,102.882 68.58,102.882 93.46,102.882 102.997,93.345 102.997,67.31 J5.4
CLK: IC3.6 J5.6 U8.20 | length 77
  Top Layer w0.127: U8.20 58.293,103.124 57.785,102.616 57.785,101.6 58.166,101.219 61.214,101.219 61.849,101.854 IC3.6 66.191,101.854 66.395,102.058 v1(67.31,102.057)
  Bottom Layer w0.127: v1(67.31,102.057) 67.894,102.057 68.19,102.353 68.58,102.353 93.033,102.353 102.235,93.151 102.235,71.628 J5.6
DA_CS: DA1.5 ESP32-S3.8 | length 47.7
  Top Layer w0.127: DA1.5 65.065,79.924 65.786,80.645 67.691,80.645 67.949,80.903 v1(67.949,86.012)
  Bottom Layer w0.127: ESP32-S3.8 44.831,107.569 53.213,107.569 67.945,92.837 v1@67.945,86.012
DA_MOSI: DA1.4 ESP32-S3.11 | length 50.9
  Top Layer w0.127: DA1.4 65.065,85.639 65.532,86.106 v1(65.659,86.106)
  Bottom Layer w0.127: ESP32-S3.11 37.058,107.722 39.018,107.722 39.878,108.581 39.878,108.843 40.738,109.702 41.558,109.702 42.353,108.908 42.353,108.305 43.343,107.315 52.894,107.315 67.012,93.197 67.012,87.459 v1(65.659,86.106)
DA_VREF: DA1.7 OP1.6 OP1.7 | length 22.1
  Top Layer w0.127: v1(65.913,76.327) 66.365,76.779 DA1.7
  Bottom Layer w0.127: OP1.7 OP1.6 54.069,76.327 v1(65.913,76.327)
DIN: J3.1 J5.3 U8.17 | length 98.3
  Top Layer w0.127: J3.1 47.842,113.702 48.731,113.702 52.451,109.982 52.451,104.648 v1(53.34,103.759) ; v1(57.785,99.314) U8.17 61.087,99.314 61.731,99.958 65.871,99.958 66.344,100.432 v1(67.31,100.432)
  Bottom Layer w0.127: v1(53.34,103.759) v1(57.785,99.314) ; v1(67.31,100.432) 67.92,100.432 69.319,101.831 92.75,101.831 97.917,96.664 97.917,63.5 J5.3
DIN0: IC3.10 J3.2 | length 30.9
  Top Layer w0.127: J3.2 48.895,116.332 55.245,109.982 v1(55.245,97.536) ; v1(61.595,96.774) IC3.10
  Bottom Layer w0.127: v1(55.245,97.536) 56.007,96.774 v1(61.595,96.774)
DOUT: IC3.3 J5.10 | length 63
  Top Layer w0.127: IC3.3 65.278,105.664 66.548,104.394 66.814,104.394 66.825,104.405 67.219,104.405 v1(67.31,104.496) ; J5.10 98.298,80.899 98.298,90.551 102.743,94.996 102.743,96.52 v1(101.6,97.663)
  Bottom Layer w0.127: v1(67.31,104.496) 67.32,104.486 67.98,104.486 69.312,103.154 96.109,103.154 v1(101.6,97.663)
GND: AD1.2 C1.1 C3.1 C8.1 C10.1 C11.1 C13.1 C14.1 C15.1 C16.1 C18.1 C19.1 C20.1 C21.1 C22.1 C23.1 C25.1 C26.1 C27.1 C28.1 C29.1 DA1.2 ESP32-S3.13 IC1.5 IC1.11 IC3.11 IC3.13 IC3.14 J4.4 J4.5 J4.9 J4.10 J6.2 J8.2 L1.P$3 OP1.3 R3.1 R5.1 R10.2 R11.1 R12.1 R18.2 R20.1 R21.2 R26.1 R31.1 T3.3 U8.8 U8.9 U8.10 U8.11 U8.12 U8.13 U8.22 VREG.3 | length 450.7
  Top Layer w0.127: ESP32-S3.13 30.988,110.344 33.322,112.678 C1.1 39.243,112.903 41.275,114.935 J6.2 ; J4.9 32.385,74.676 32.385,68.707 34.417,66.675 J4.5 J4.4 36.449,66.04 48.608,66.04 OP1.3 52.626,62.022 C15.1 C8.1 60.356,59.721 61.276,58.801 66.802,58.801 72.485,64.484 74.644,64.484 T3.3 75.184,67.31 R26.1 R5.1 R3.1 ; R31.1 40.913,41.402 v1(41.679,42.169) ; U8.8 U8.9 U8.10 U8.11 U8.12 50.266,93.244 53.642,89.868 53.642,89.329 ; VREG.3 51.955,76.536 R21.2@51.955,75.14 ; C18.1 C19.1 C13.1 C14.1 53.339,38.099 J8.2 49.911,32.131 50.552,32.772 61.442,32.772 61.516,32.846 C29.1 62.865,33.909 63.373,34.417 63.373,35.941 64.663,37.231 C28.1 67.163,37.231 67.818,36.576 70.358,36.576 71.323,35.611 C26.1 C25.1 79.34,35.611 R12.1 79.391,35.56 80.645,35.56 80.772,35.687 80.772,38.354 78.597,40.529 IC1.5 78.597,43.27 78.474,43.393 78.474,43.493 77.697,44.27 IC1.11 ; C11.1 55.289,74.965 R21.2 R21.2@51.955,75.14 ; v1(55.372,91.059) 53.642,89.329 ; v1(58.57,91.088) 58.137,91.088 57.277,91.948 57.277,93.599 57.912,94.234 ; U8.13 57.912,94.234 ; U8.22 58.166,105.664 56.66,104.158 56.66,95.486 57.912,94.234 ; R18.2 62.608,53.721 v1(63.322,54.435) ; v1(63.012,92.448) 65.524,92.448 v1(68.58,95.504) ; IC3.11@63.347,95.631 IC3.11 v1(68.58,95.504) ; AD1.2 66.294,71.686 70.231,75.623 v1(70.231,75.692) ; DA1.2 66.365,83.764 v1(67.056,84.455) ; R11.1 69.866,52.816 70.231,52.451 70.231,50.165 70.612,49.784 73.428,49.784 74.46,50.816 R10.2 77.652,50.816 C27.1 77.738,50.8 v1(79.121,50.8) ; IC3.13 IC3.14 v1(68.58,95.504) ; L1.P$3 L1.P$3@73.787,42.583 ; R3.1@80.235,69.104 R3.1 ; v1(80.772,56.261) v1@80.772,56.373 ; v1(81.026,67.945) 80.391,67.945 80.01,68.326 R3.1 ; v1(82.161,54.794) 82.218,54.737 82.931,54.737 83.36,54.308 C16.1 C20.1 C21.1 C22.1 C23.1 C23.1@83.439,45.006 ; v1(84.836,67.945) 91.932,67.945 R20.1 94.047,69.104 v1(94.667,69.724) ; C3.1 93.062,82.121 94.016,81.167 94.016,80.99 v1(94.107,80.899) ; R21.2@51.955,75.14 55.118,78.304 55.118,87.503 54.356,88.265 C10.1 53.642,89.329
  Bottom Layer w0.127: ESP32-S3.13 32.893,110.617 34.29,110.617 34.798,110.109 34.798,107.569 27.051,99.822 27.051,78.105 27.04,78.094 27.04,77.989 28.194,76.835 J4.9 ; J4.4 41.679,57 v1(41.679,42.169) ; J4.10 J4.9 ; VREG.3 49.182,76.835 J4.9 ; v1(55.372,91.059) 55.401,91.088 v1(58.57,91.088) 59.93,92.448 v1(63.012,92.448) ; v1(63.322,54.435) 65.148,56.261 v1(80.772,56.261) 80.772,56.222 82.161,54.833 v1(82.161,54.794) 80.702,54.794 79.883,53.975 79.883,51.562 v1(79.121,50.8) ; v1(67.056,84.455) 71.374,84.455 v1(71.882,84.963) ; v1(68.58,95.504) 71.882,92.202 v1(71.882,84.963) ; v1(70.231,75.692) 70.358,75.692 71.882,77.216 v1(71.882,84.963) ; v1(81.026,67.945) v1(84.836,67.945) ; v1(94.107,80.899) 94.667,80.339 v1(94.667,69.724)
HVL_BL: ESP32-S3.1 U8.6 | length 27.8
  Top Layer w0.127: ESP32-S3.1 30.099,91.821 36.322,91.821 37.338,92.837 37.338,94.869 44.323,101.854 U8.6
HVL_CLK: ESP32-S3.4 U8.4 | length 27.9
  Top Layer w0.127: ESP32-S3.4 34.874,92.278 32.944,92.278 32.258,92.964 32.258,93.903 33.351,94.996 33.782,94.996 43.18,104.394 U8.4
HVL_DIOB: ESP32-S3.5 U8.7 | length 14.6
  Top Layer w0.127: ESP32-S3.5 45.72,100.584 U8.7
HVL_LE: ESP32-S3.2 U8.3 | length 24.3
  Top Layer w0.127: ESP32-S3.2 43.18,105.664 U8.3
HVL_POL: ESP32-S3.3 U8.5 | length 20.7
  Top Layer w0.127: ESP32-S3.3 43.18,103.124 U8.5
LE: IC3.7 J5.7 U8.21 | length 77.3
  Top Layer w0.127: U8.21 58.166,104.394 57.023,103.251 57.023,101.346 58.42,99.949 61.087,99.949 61.722,100.584 IC3.7 65.778,100.584 66.438,101.244 v1(67.31,101.244)
  Bottom Layer w0.127: v1(67.31,101.244) 67.377,101.311 67.8,101.311 68.58,102.091 92.85,102.091 101.854,93.087 101.854,73.787 J5.7
NetC4_1: C4.1 DA1.1 OP1.2 | length 33.6
  Top Layer w0.127: C4.1 47.001,63.859 OP1.2 ; v1(57.15,70.739) 62.23,75.819 62.23,79.248 64.262,81.28 66.802,81.28 67.015,81.493 DA1.1
  Bottom Layer w0.127: OP1.2 53.881,70.739 v1(57.15,70.739)
NetC11_2: C11.2 OP1.5 R4.1 R21.1 | length 13.2
  Top Layer w0.127: R4.1 R21.1 50.054,74.79 52.23,72.615 52.513,72.615 OP1.5 55.659,72.423 56.97,73.734 56.97,73.978 56.944,74.005 C11.2
NetC12_1: C12.1 VREG.4 | length 11.8
  Top Layer w0.127: C12.1 49.276,88.059 49.276,81.755 VREG.4
NetC12_2: C12.2 VREG.2 | length 11.1
  Top Layer w0.127: C12.2 47.45,88.04 46.609,87.199 46.609,79.342 VREG.2
NetC13_2: C13.2 C14.2 C18.2 C19.2 D2.2 J2.1 R15.1 | length 52.3
  Top Layer w0.127: C14.2 C13.2 C19.2 C18.2 50.039,49.15 50.8,49.911 54.102,49.911 56.216,47.797 v1(56.216,41.121) 57.64,42.545 60.515,42.545 61.552,41.508 D2.2 ; D2.2@61.574,41.508 R15.1
  Bottom Layer w0.127: J2.1@41.529,32.004 44.323,32.004 50.038,37.719 54.483,37.719 56.216,39.452 v1(56.216,41.121)
NetC25_2: C25.2 IC1.3 | length 5.5
  Top Layer w0.127: C25.2 76.073,37.236 76.073,38.354 77.597,39.878 IC1.3
NetC26_2: C26.2 IC1.1 R14.2 | length 11.3
  Top Layer w0.127: R14.2 69.458,37.465 70.866,37.465 71.1,37.231 C26.2 72.725,38.435 73.025,38.735 75.311,38.735 76.597,40.021 IC1.1
NetC27_2: C27.2 IC1.6 R13.2 | length 15.1
  Top Layer w0.127: R13.2 72.66,50.816 73.66,51.816 76.807,51.816 77.462,52.471 C27.2 77.707,52.451 79.248,52.451 80.01,51.689 80.01,48.641 78.663,47.294 78.663,46.548 IC1.6
NetC28_2: C28.2 R14.1 | length 3.3
  Top Layer w0.127: C28.2 66.075,35.576 R14.1
NetC29_2: C29.2 R19.2 | length 2.9
  Top Layer w0.127: R19.2 59.579,35.544 59.896,35.227 C29.2
NetD1_2: D1.2 J6.1 | length 5.4
  Top Layer w0.127: D1.2 38.608,116.586 J6.1
NetD2_1: D2.1 L1.P$2 | length 17.3
  Top Layer w0.127: D2.1 61.552,39.835 v1(61.976,40.259) ; v1(70.612,47.117) 70.74,47.117 70.994,47.371 73.152,47.371 73.773,46.75 L1.P$2
  Bottom Layer w0.127: v1(61.976,40.259) 68.834,47.117 v1(70.612,47.117)
NetD3_1: D3.1 J8.1 | length 7.8
  Top Layer w0.127: J8.1 44.958,32.004 44.958,30.861 47.328,28.491 D3.1
NetIC1_2: IC1.2 R17.2 R18.1 | length 35.3
  Top Layer w0.127: R18.1 59.563,53.71 59.563,52.197 59.944,51.816 61.087,51.816 61.574,51.329 R17.2 61.653,50.419 62.357,50.419 62.992,49.784 62.992,39.19 63.5,38.682 63.574,38.608 70.612,38.608 72.136,40.132 75.057,40.132 75.766,40.841 75.766,42.873 75.946,43.053 76.909,43.053 77.075,42.887 77.075,42.08 IC1.2
NetIC1_4: IC1.4 R12.2 | length 5
  Top Layer w0.127: IC1.4 78.097,40.14 79.375,38.862 R12.2
NetIC1_7: IC1.7 U5.1 | length 11.4
  Top Layer w0.127: U5.1 68.955,48.612 69.492,49.149 76.962,49.149 78.097,48.014 IC1.7 IC1.7@78.101,46.478
NetIC1_9: IC1.9 R9.1 R11.2 | length 20.2
  Top Layer w0.127: R9.1 66.818,52.816 67.31,52.324 67.31,51.292 ; R11.2 67.786,50.816 67.31,51.292 ; IC1.9 77.075,46.504 77.075,47.385 75.946,48.514 71.12,48.514 69.469,46.863 68.072,46.863 67.31,47.625 67.31,51.292
NetJ1_2: J1.2 R1.2 | length 3.2
  Top Layer w0.127: J1.2 88.503,69.104 R1.2
NetL1_P$1: L1.P$1 R19.1 U5.2 | length 19.9
  Top Layer w0.127: R19.1 62.611,36.703 v1(63.119,37.211) ; U5.2 67.945,43.561 v1(70.739,43.561) 70.866,43.561 72.023,44.718 L1.P$1
  Bottom Layer w0.127: v1(63.119,37.211) 63.119,38.354 66.675,41.91 69.088,41.91 v1(70.739,43.561)
NetOP2_1: OP2.1 T4.2 | length 18
  Bottom Layer w0.127: OP2.1 76.817,77.216 79.121,77.216 79.629,77.724 79.629,78.867 80.899,80.137 90.424,80.137 T4.2
NetOP2_2: OP2.2 R5.2 T4.3 | length 23.4
  Top Layer w0.127: R5.2 77.597,77.198 OP2.2
  Bottom Layer w0.127: OP2.2 80.79,80.391 92.329,80.391 92.71,80.01 T4.3
NetOP2_5: OP2.5 R2.1 R3.2 | length 26.1
  Top Layer w0.127: R3.2 R2.1 82.296,78.867 77.597,83.566 77.597,86.36 78.232,86.995 82.598,86.995 OP2.5
NetOP2_6: OP2.6 OP2.7 R29.2 | length 13.1
  Top Layer w0.127: OP2.7 OP2.6 84.979,82.074 R29.2
NetR1_1: R1.1 R20.2 | length 2.4
  Top Layer w0.127: R1.1 R20.2
NetR6_1: R6.1 T1.1 | length 47.5
  Top Layer w0.127: R6.1 54.665,54.229 v1(54.731,54.294)
  Bottom Layer w0.127: v1(54.731,54.294) 58.221,57.785 89.281,57.785 92.075,60.579 T1.1
NetR7_1: R7.1 T2.1 | length 42.9
  Top Layer w0.127: R7.1 54.102,51.308 58.293,55.499 81.915,55.499 85.471,59.055 T2.1
NetR10_1: R10.1 R13.1 U5.3 | length 17.4
  Top Layer w0.127: U5.3 64.395,50.032 63.246,51.181 63.246,52.959 64.516,54.229 70.081,54.229 71.494,52.816 R13.1 R10.1
NetR15_2: R15.2 R16.1 | length 3.2
  Top Layer w0.127: R15.2 R16.1
NetR16_2: R16.2 R17.1 | length 4.6
  Top Layer w0.127: R17.1 59.574,49.392 60.198,48.768 61.087,48.768 61.574,48.281 R16.2
NetT1_2: T1.2 T2.2 T3.1 | length 12.5
  Bottom Layer w0.127: T3.1 80.264,64.77 T2.2 T1.2
NetT1_3: T1.3 T3.2 T4.1 | length 27.9
  Bottom Layer w0.127: T3.2 77.597,66.929 77.851,67.183 88.492,67.183 T1.3 89.535,78.604 89.916,78.985 T4.1
OUT1: "Onboard electrode OUT.8" IC3.15 pad.1 | length 83.9
  Top Layer w0.127: 62.484,118.11 62.484,118.364 60.96,119.888 53.848,119.888 52.832,118.872 52.832,114.605 55.423,112.014 67.183,112.014 69.088,110.109 69.088,99.314 71.579,96.823 72.621,96.823 IC3.15
  Bottom Layer w0.127: 62.484,118.11 64.107,119.733 71.783,119.733 82.257,109.259 90.487,109.259 91.908,110.68 pad.1
OUT2: "Onboard electrode OUT.6" IC3.16 pad.2 | length 77.9
  Top Layer w0.127: 59.944,118.11 58.42,119.634 53.975,119.634 53.086,118.745 53.086,114.71 55.528,112.268 67.31,112.268 69.342,110.236 69.342,100.203 71.501,98.044 IC3.16
  Bottom Layer w0.127: 59.944,118.11 61.841,120.007 71.921,120.007 82.376,109.551 86.913,109.551 pad.2
OUT3: "Onboard electrode OUT.4" IC3.17 pad.3 | length 81.7
  Top Layer w0.127: 57.404,118.11 56.134,119.38 54.102,119.38 53.34,118.618 53.34,114.815 55.633,112.522 67.437,112.522 69.596,110.363 69.596,101.219 71.501,99.314 IC3.17
  Bottom Layer w0.127: 57.404,118.11 59.574,120.28 72.048,120.28 79.791,112.537 92.344,112.537 94.042,114.235 pad.3
OUT4: "Onboard electrode OUT.2" "Onboard electrode OUT.10" IC3.18 pad.4 | length 84.9
  Top Layer w0.127: 54.864,118.11 54.61,118.11 53.594,117.094 53.594,114.921 55.739,112.776 67.564,112.776 69.85,110.49 69.85,102.362 71.579,100.633 72.621,100.633 IC3.18
  Bottom Layer w0.127: 65.024,118.11 63.881,116.967 56.007,116.967 54.864,118.11 57.302,120.548 72.177,120.548 79.895,112.83 88.192,112.83 pad.4
OUT5: "Onboard electrode OUT.1" "Onboard electrode OUT.9" IC3.19 pad.5 | length 80.3
  Top Layer w0.127: 65.024,115.57 63.881,116.713 56.007,116.713 54.864,115.57 57.404,113.03 67.691,113.03 70.104,110.617 70.104,103.251 71.501,101.854 IC3.19
  Bottom Layer w0.127: 54.864,115.57 53.34,117.094 53.34,119.126 55.035,120.821 72.3,120.821 80.007,113.114 84.477,113.114 pad.5
OUT6: "Onboard electrode OUT.3" IC3.20 pad.6 | length 78.4
  Top Layer w0.127: 57.404,115.57 59.69,113.284 67.818,113.284 70.358,110.744 70.358,104.267 71.501,103.124 IC3.20
  Bottom Layer w0.127: 57.404,115.57 55.88,114.046 54.229,114.046 53.065,115.21 53.065,119.222 54.934,121.091 72.426,121.091 77.002,116.515 92.131,116.515 94.042,118.426 pad.6
OUT7: "Onboard electrode OUT.5" IC3.21 pad.7 | length 74.1
  Top Layer w0.127: 59.944,115.57 61.976,113.538 67.945,113.538 70.612,110.871 70.612,105.286 71.504,104.394 IC3.21
  Bottom Layer w0.127: 59.944,115.57 58.152,113.778 54.108,113.778 52.793,115.093 52.793,119.329 54.825,121.361 72.548,121.361 77.112,116.797 88.159,116.797 pad.7
OUT8: "Onboard electrode OUT.7" IC3.22 pad.8 | length 69.9
  Top Layer w0.127: 62.484,115.57 64.262,113.792 68.072,113.792 70.866,110.998 70.866,106.299 71.501,105.664 IC3.22
  Bottom Layer w0.127: 62.484,115.57 60.421,113.507 53.997,113.507 52.515,114.988 52.515,119.441 54.706,121.631 72.669,121.631 77.207,117.094 84.457,117.094 pad.8
POL: IC3.5 J5.5 U8.19 | length 75.2
  Top Layer w0.127: U8.19 60.833,101.854 62.103,103.124 IC3.5 66.04,103.124 66.294,102.87 v1(67.31,102.87)
  Bottom Layer w0.127: v1(67.31,102.87) 67.882,102.87 68.136,102.616 68.58,102.616 93.218,102.616 102.616,93.218 102.616,69.469 J5.5
SPI_CLK: AD1.4 DA1.3 ESP32-S3.9 | length 63.4
  Top Layer w0.127: v1(63.627,79.121) 62.738,78.232 62.738,70.612 64.262,69.088 65.27,69.088 65.344,69.014 AD1.4 ; v1(65.702,84.512) 65.715,84.499 DA1.3
  Bottom Layer w0.127: ESP32-S3.9 42.799,107.061 52.578,107.061 66.04,93.599 66.04,89.187 64.008,87.155 64.008,85.344 ; v1(63.627,79.121) 63.627,84.963 64.008,85.344 ; v1(65.702,84.512) 64.84,84.512 64.008,85.344
Stack_Sense: ESP32-S3.6 J11.3 R30.1 R31.2 | length 65.6
  Top Layer w0.127: R30.1 R31.2 36.576,41.402 J11.3 30.861,47.117 30.861,87.683 33.615,90.436 38.112,90.436 ESP32-S3.6
VOUT: C4.2 DA1.8 OP1.1 OP2.3 R26.2 | length 57.3
  Top Layer w0.127: OP1.1 45.201,64.367 C4.2 ; v1(64.897,75.311) 64.926,75.34 66.069,75.34 67.015,76.286 DA1.8 ; v1(69.136,73.031) 69.65,72.517 74.549,72.517 75.184,71.882 ; R26.2 75.184,71.882 ; OP2.3 79.992,79.121 78.105,79.121 76.962,77.978 76.962,74.676 75.184,72.898 75.184,71.882
  Bottom Layer w0.127: OP1.1 45.085,65.278 50.8,70.993 56.261,70.993 60.579,75.311 v1(64.897,75.311) 67.177,73.031 v1(69.136,73.031)
VPP: IC3.23 IC3.24 J1.1 J4.6 R2.2 T2.3 | length 124
  Top Layer w0.127: IC3.24 IC3.23 75.438,106.934 76.581,105.791 76.581,97.155 83.566,90.17 92.329,90.17 95.123,87.376 95.123,77.724 93.345,75.946 89.789,75.946 85.217,71.374 J1.1 83.947,69.85 83.201,69.104 R2.2 82.296,67.945 82.931,67.31 T2.3 82.931,63.765 v1(81.188,62.022)
  Bottom Layer w0.127: J4.6 44.704,59.055 78.221,59.055 v1(81.188,62.022)
pads on no net: D2.3 D3.3 IC3.1 IC3.8 IC3.9 IC3.12 J4.1 J4.2 J4.11 J4.12 J5.1 J5.2 J5.8 J5.9 J5.11 J5.12 J10.1 J10.2 J10.3 J10.4 J10.5 J11.1 J11.2 J11.4 J11.5 U8.14 U8.15 U8.16 VREG.6 VREG.7

## Polygon pours and split planes (outlines as drawn)
GND on Bottom Layer "GND_L02_P002" (solid, pour order 2): 25.019,127.127 79.502,127.127 79.502,109.998 84.123,105.377 84.151,105.349 84.167,105.349 84.167,105.344 95.986,105.344 100.659,110.016 100.659,126.892 100.67,126.904 107.627,126.904 107.639,126.892 107.639,25.343 107.569,25.273 25.019,25.273
GND on Top Layer "GND_L01_P000" (solid, pour order 0): 79.375,127 79.375,109.982 84.074,105.283 96.012,105.283 100.711,109.982 100.711,126.873 107.696,126.873 107.696,25.273 25.273,25.273 25.273,127 25.527,127 25.273,127 25.527,127

## Silkscreen, mask and mechanical layers (free items; w line width, h text height)
Top Overlay:
  drawing of 40 lines, arcs and shapes, not listed
  text "Test Electordes" at 82.855,120.828 h1.02
  text "POWER   +5V" at 32.448,120.65 h1.52
  text "+" at 38.227,118.237 h1.52
  text "-" at 40.767,118.237 h1.52
  text "8" at 86.414,117.402 h1 r180
  text "7" at 90.224,117.402 h1 r180
  text "6" at 94.415,117.402 h1 r180
  text "4" at 90.224,113.465 h1 r180
  text "5" at 86.414,113.338 h1 r180
  text "3" at 94.415,113.338 h1 r180
  text "2" at 88.319,109.274 h1 r180
  text "1" at 92.256,109.274 h1 r180
  text "Controller Board" at 85.496,95.275 h1.02
  text "NC" at 101.271,81.026 h1.52
  text "NC" at 30.697,80.896 h1.52
  text "DOUT" at 101.498,78.892 h1.02
  text "GND" at 32.893,76.581 h1.52 r90
  text "+3.3V" at 28.346,73.685 h1.02
  text "NC" at 101.309,73.403 h1.52
  text "LE" at 101.498,71.145 h1.02
  text "+5V" at 30.191,71.045 h1.02
  text "CLK" at 101.498,68.732 h1.02
  text "VPP" at 30.205,68.563 h1.02
  text "POL" at 101.498,66.192 h1.02
  text "GND" at 32.935,63.798 h1.52 r90
  text "BL" at 101.498,63.779 h1.02
  text "DIN" at 101.498,61.112 h1.02
  text "+5V" at 30.124,60.985 h1.02
  text "NC" at 101.436,55.496 h1.52
  text "NC" at 30.57,55.369 h1.52
  text "NC" at 30.57,44.893 h1.52
  text "STK" at 30.124,42.824 h1.02
  text "NC" at 30.57,37.273 h1.52
  text "NC" at 101.33,36.957 h1.52
  text "+300V" at 43.434,33.672 h1.5
  text "GND" at 47.561,33.401 h1.52
  text "Do Not Touch" at 54.927,26.094 h1.52
Mechanical 1:
  lines w0.254: 25.392,31.25 ccw(c31.242,31.25) 31.242,25.4 ; 25.4,30.988 25.4,121.158 ; 25.415,121.048 cw(c31.264,121.048) 31.264,126.897 ; 30.861,126.873 92.075,126.873 ; 30.988,25.4 101.719,25.4 ; 79.375,126.873 79.375,109.982 84.074,105.283 96.012,105.283 100.711,109.982 100.711,126.873 ; 91.821,126.873 102.362,126.873 ; 101.719,25.392 ccw(c101.719,31.242) 107.569,31.242 107.569,121.539 ; 101.726,126.893 cw(c101.726,121.044) 107.576,121.044

## Text inside footprints (layer, text, board x,y; h text height)
ESP32-S3: Mechanical 13 "JP2" at 45.212,109.347 h1.02 r270; Mechanical 13 "JP1" at 45.212,94.742 h1.02 r270